# Altium PCB Vortex_PCB_final.PcbDoc (part 1 of 2)
Units mm, origin at the board's own origin, x right, y up, seen from the top; angles counter-clockwise.
Board outline 125 x 90 mm, 2 copper layers (Top Layer, Bottom Layer); 148 components, 88 nets, 464 pads, 104 vias.
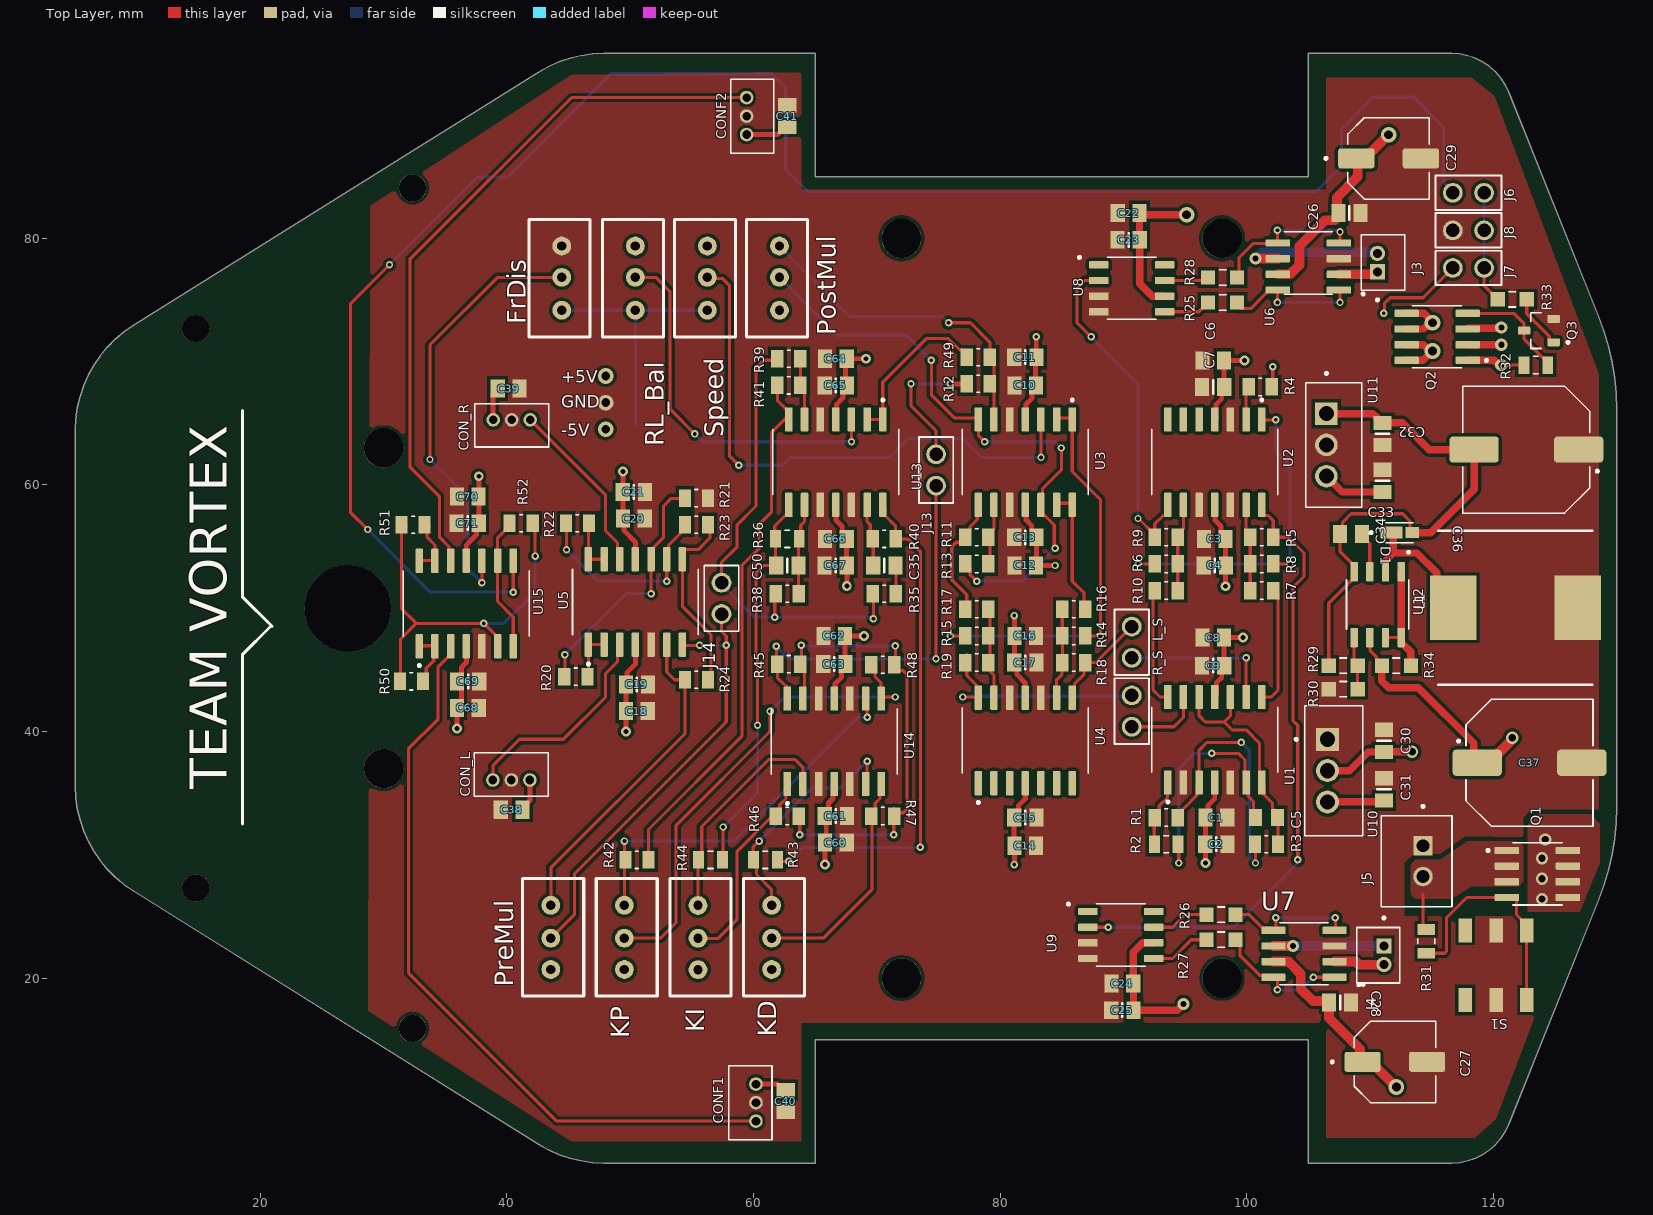
[diagram p0: Top Layer view]
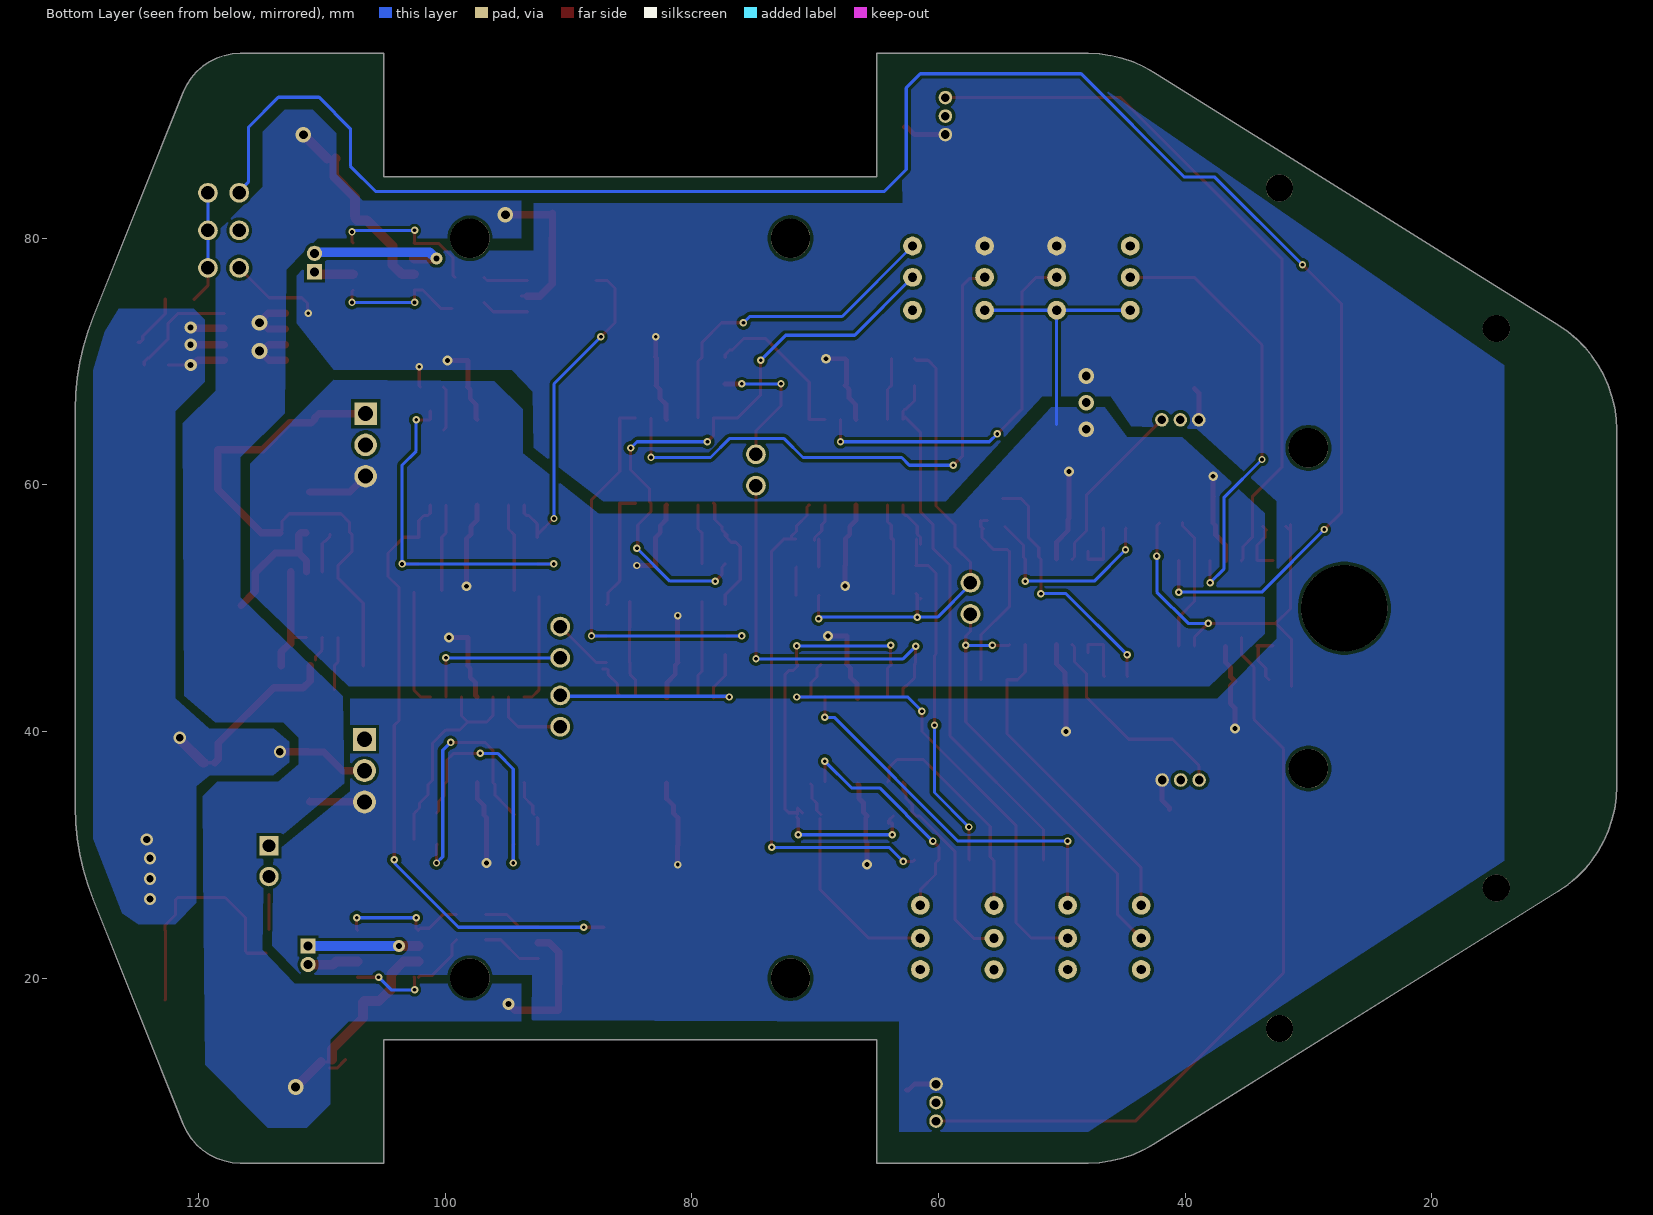
[diagram p1: Bottom Layer view, seen from below]
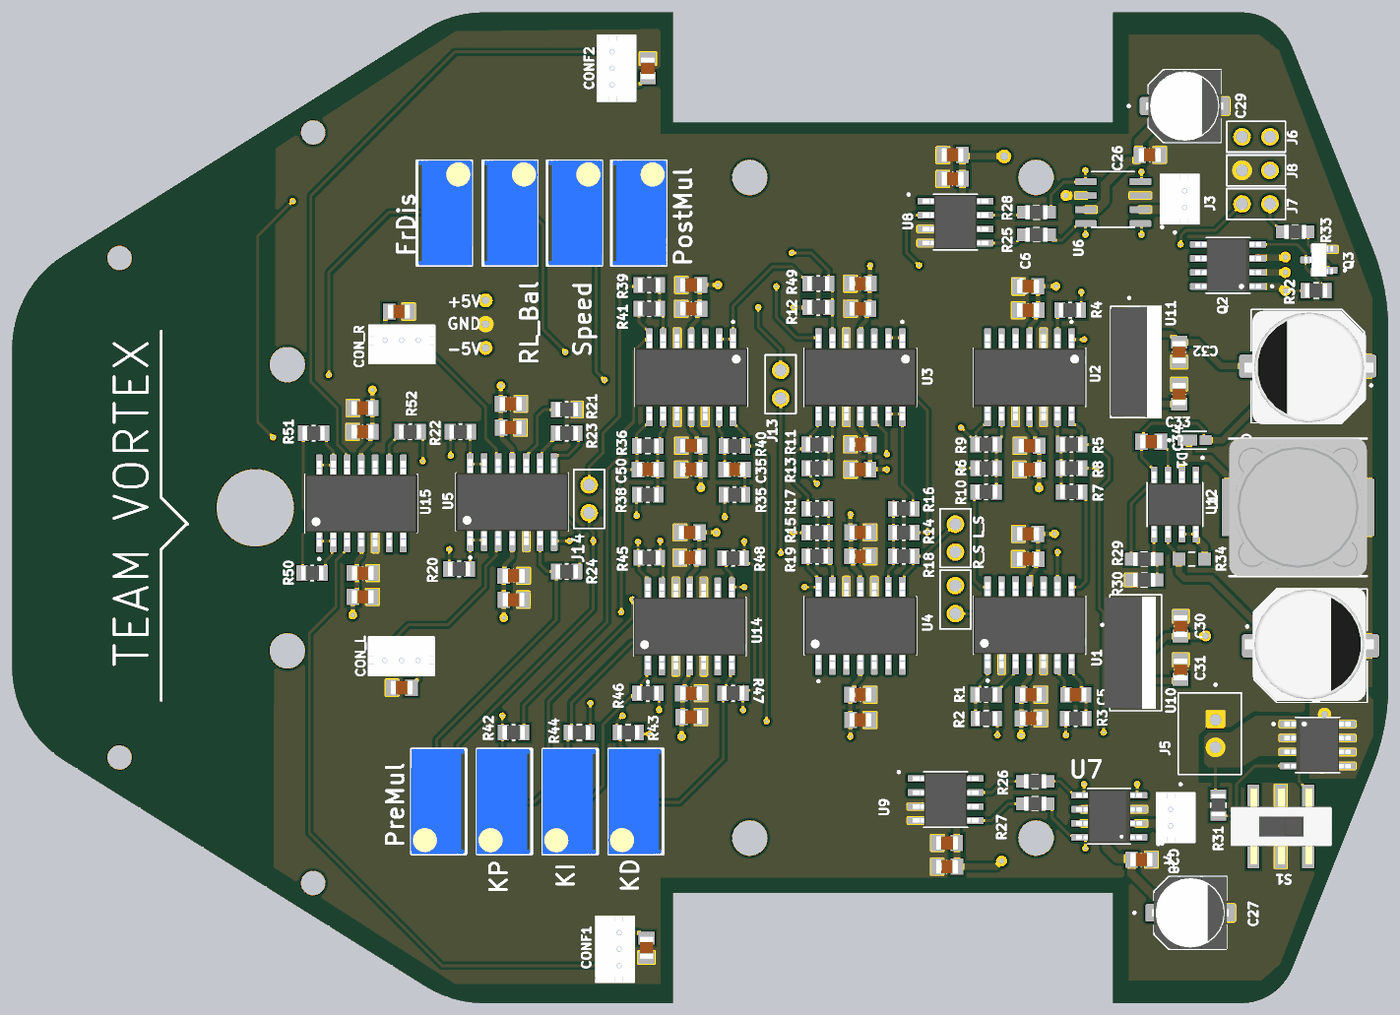
[diagram p2: 3D render of the assembled board from above, using the file's embedded part models]

## Layer stack, top to bottom
Top Solder: solder mask 0.0102, Solder Resist, Dk 3.5
Top Layer: signal copper 0.0356
Dielectric 1: dielectric 0.32, FR-4, Dk 4.8
Bottom Layer: signal copper 0.0356
Bottom Solder: solder mask 0.0102, Solder Resist, Dk 3.5

## Board outline
105,5 116.615,5 117.274,5.044 117.922,5.174 118.547,5.388 119.138,5.683 119.685,6.054 120.179,6.493 120.61,6.994 120.972,7.547 121.257,8.143 128.57,26.424 129.003,27.616 129.36,28.832 129.639,30.07 129.839,31.322 129.96,32.584 130,33.852 130,66.148 129.96,67.416 129.839,68.678 129.639,69.931 129.36,71.168 129.003,72.384 128.57,73.576 121.257,91.857 120.972,92.453 120.61,93.006 120.179,93.507 119.685,93.946 119.138,94.317 118.547,94.612 117.922,94.826 117.274,94.956 116.615,95 105,95 105,85 65,85 65,95 47.868,95 46.938,94.957 46.017,94.827 45.111,94.612 44.229,94.315 43.379,93.936 42.568,93.48 9.7,72.938 8.943,72.415 8.238,71.824 7.589,71.172 7.004,70.463 6.486,69.702 6.04,68.898 5.67,68.056 5.379,67.183 5.169,66.288 5.042,65.376 5,64.458 5,35.542 5.042,34.624 5.169,33.712 5.379,32.817 5.67,31.944 6.04,31.102 6.486,30.298 7.004,29.537 7.589,28.828 8.238,28.176 8.943,27.585 9.7,27.063 42.568,6.52 43.379,6.064 44.229,5.685 45.111,5.388 46.017,5.173 46.938,5.043 47.868,5 65,5 65,15 105,15

## Design rules (kind name [scope] priority, off if disabled: settings)
Clearance [All] p1: gap=0.254 ignorepadtopadclearanceinfootprint=FALSE except(0: Arc-Hole Track-Hole SMDPad-Hole THPad-Hole Via-Hole Fill-Hole Poly-Hole Region-Hole Text-Text Text-Hole; 0.2: SMDPad-SMDPad)
HoleSize [All] p1: absolutevalues=TRUE maxlimit=7 minlimit=0.025 maxpercent=80.000 minpercent=20.000
PolygonConnect [All] p1: connectstyle=Direct reliefconductorwidth=0.254 reliefentries=4 polygonreliefangle="90 Angle" airgapwidth=0.254
RoutingVias [All] p1: holewidth=0.711 width=1.27 viastyle="Through Hole" minholewidth=0.711 minwidth=1.27 maxholewidth=0.711 maxwidth=1.27
SilkToSilkClearance [All] p1: silktosilkclearance=0
SolderMaskExpansion [All] p1: expansion=0.102 istentingtop=FALSE
UnRoutedNet [All] p1: checkbadconnections=TRUE
Width [All] p1: maxlimit=1 minlimit=0.254 preferedwidth=0.254 minimp=50.000000 maximp=50.000000 favimp=50.000000
27 further rules are at their usual default settings.

## Classes and differential pairs
component class Sensor_Interface_SharpIR: C18 C19 C20 C21 C38 C39 CON_L CON_R PreMul R20 R21 R22 R23 R24 U5
component class PWM_Generator: C1 C2 C3 C4 C5 C6 C7 C8 C9 L_S R1 R2 R3 R4 R5 R6 R7 R8 R9 R10 R_S U1 U2
component class Power_Management: C C30 C31 C32 C33 C34 C36 C37 C? D1 D? J5 L1 L? Q1 Q2 Q3 R29 R30 R31 R32 R33 R34 S1 U10 U11 U12
component class PID_Controller: C35 C50 C60 C61 C62 C63 C64 C65 C66 C67 J14 KD KI KP R35 R36 R38 R39 R40 R41 R42 R43 R44 R45 R46 R47 R48 U13 U14
component class Mosfet_HBridge_Driver: C22 C23 C24 C25 C26 C27 C28 C29 J3 J4 R25 R26 R27 R28 U6 U7 U8 U9
component class "Front Obstacle Brake": C40 C41 C68 C69 C70 C71 CONF1 CONF2 FrDis J6 J7 J8 R50 R51 R52 U15
component class Differential_Drive_Mixer: C10 C11 C12 C13 C14 C15 C16 C17 J13 PostMul R11 R12 R13 R14 R15 R16 R17 R18 R19 R49 RL_Bal Speed U3 U4

## Components (designator, comment, footprint, x,y, rotation, side; value= is the part's Value field where it differs from the comment)
C1 "10uF" CAPC2012X145N 97.536,33.02 r180 top
C2 "0.1uF" CAPC2012X140N 97.536,30.861 r0 top
C3 "10uF" CAPC2012X145N 97.409,55.626 r0 top
C4 "0.1uF" CAPC2012X140N 97.409,53.467 r180 top
C5 "22nF" CAPC2012X135N 101.6,33.02 r180 top
C6 "10uF" CAPC2012X145N 97.282,70.104 r0 top
C7 "0.1uF" CAPC2012X140N 97.282,67.945 r180 top
C8 "10uF" CAPC2012X145N 97.282,47.625 r0 top
C9 "0.1uF" CAPC2012X140N 97.282,45.339 r180 top
C10 "10uF" CAPC2012X145N 82.042,68.072 r0 top
C11 "0.1uF" CAPC2012X140N 82.042,70.358 r180 top
C12 "10uF" CAPC2012X145N 82.042,53.467 r0 top
C13 "0.1uF" CAPC2012X140N 82.042,55.753 r180 top
C14 "10uF" CAPC2012X145N 82.042,30.734 r180 top
C15 "0.1uF" CAPC2012X140N 82.042,33.02 r0 top
C16 "10uF" CAPC2012X145N 82.042,47.752 r180 top
C17 "0.1uF" CAPC2012X140N 82.042,45.593 r0 top
C18 "10uF" CAPC2012X145N 50.546,41.656 r180 top
C19 "0.1uF" CAPC2012X140N 50.546,43.815 r0 top
C20 "10uF" CAPC2012X145N 50.292,57.277 r180 top
C21 "0.1uF" CAPC2012X140N 50.292,59.436 r0 top
C22 "10uF" CAPC2012X145N 90.424,82.042 r180 top
C23 "0.1uF" CAPC2012X140N 90.424,79.883 r0 top
C24 "10uF" CAPC2012X145N 89.916,19.558 r180 top
C25 "0.1uF" CAPC2012X140N 89.916,17.399 r0 top
C26 "0.1uF" CAPC2012X140N 108.331,82.042 r180 top
C27 "10uF" CAPAE660X610N 112.014,13.208 r0 top
C28 "0.1uF" CAPC2012X140N 107.569,18.034 r180 top
C29 "10uF" CAPAE660X610N 111.506,86.487 r0 top
C30 "0.1uF" CAPC2012X140N 111.125,39.243 r270 top
C31 "0.1uF" CAPC2012X140N 111.125,35.306 r270 top
C32 "0.1uF" CAPC2012X140N 110.998,64.135 r90 top
C33 "0.1uF" CAPC2012X140N 110.998,60.325 r270 top
C34 "1500pF" CAPC2012X145N 108.458,56.007 r180 top
C35 "1u" CAPC2012X140N 70.612,53.467 r180 top
C36 "220uF" CAPAE1030X1080N_UWT1H221MNL1GS 122.682,62.865 r180 top
C37 "100uF" CAPAE1030X1080N_UWT1H221MNL1GS 122.936,37.465 r0 top
C38 "10uF" CAPC2012X145N 40.386,33.655 r0 top
C39 "10uF" CAPC2012X145N 40.132,67.818 r180 top
C40 "10uF" CAPC2012X145N 62.611,10.033 r90 top
C41 "10uF" CAPC2012X145N 62.738,89.916 r270 top
C50 "47u" CAPC2012X140N 62.738,53.467 r0 top
C60 "10uF" CAPC2012X145N 66.675,30.988 r180 top
C61 "0.1uF" CAPC2012X140N 66.675,33.147 r0 top
C62 "10uF" CAPC2012X145N 66.548,47.752 r0 top
C63 "0.1uF" CAPC2012X140N 66.548,45.466 r180 top
C64 "10uF" CAPC2012X145N 66.675,70.231 r0 top
C65 "0.1uF" CAPC2012X140N 66.675,68.072 r180 top
C66 "10uF" CAPC2012X145N 66.675,55.626 r0 top
C67 "0.1uF" CAPC2012X140N 66.664,53.467 r180 top
C68 "10uF" CAPC2012X145N 36.839,41.91 r180 top
C69 "0.1uF" CAPC2012X140N 36.85,44.069 r0 top
C70 "10uF" CAPC2012X145N 36.821,59.055 r0 top
C71 "0.1uF" CAPC2012X140N 36.821,56.896 r180 top
CON_L "B3B-ZR" B3B-ZR 40.362,36.068 r180 top
CON_R "B3B-ZR" B3B-ZR 40.386,65.278 r0 top
CONF1 "B3B-ZR" B3B-ZR 60.198,9.906 r270 top
CONF2 "B3B-ZR" B3B-ZR 59.436,89.916 r90 top
D1 "SS24M" SODFL2512X73N 112.395,56.134 r0 top
FrDis "Variable Resistor" PCBComponent_1#1 44.45,75.679 r0 top
J3 "B2B-ZR" JST_B2B-ZR(LF)(SN) 111.052,78.032 r270 top
J4 "B2B-ZR" JST_B2B-ZR(LF)(SN) 110.675,21.856 r90 top
J5 "B2B-XH-A" JST_B2B-XH-A 113.775,29.484 r90 top
J6 "2_pin_header" CONN02_901200922_MOL 116.713,83.693 r0 top
J7 "2_pin_header" CONN02_901200922_MOL 116.713,77.597 r0 top
J8 "2_pin_header" CONN02_901200922_MOL 116.713,80.645 r0 top
J13 "male header" CONN02_901200922_MOL 74.803,62.484 r270 top
J14 "male header" CONN02_901200922_MOL 57.404,52.07 r270 top
KD "Variable Resistor" PCBComponent_1#1 61.468,24.397 r180 top
KI "Variable Resistor" PCBComponent_1#1 55.499,24.384 r180 top
KP "Variable Resistor" PCBComponent_1#1 49.53,24.397 r180 top
L1 "100uH" INDPM125125X800N 121.793,50.038 r0 top
L_S "male_header" CONN02_901200922_MOL 90.678,45.974 r90 top
PostMul "Variable Resistor" PCBComponent_1#1 62.103,75.679 r0 top
PreMul "Variable Resistor" PCBComponent_1#1 43.561,24.397 r180 top
Q1 "AO4407A" SOIC127P600X175-8N#1 123.571,28.448 r0 top
Q2 "AO4407A" SOIC127P600X175-8N#1 115.443,72.009 r180 top
Q3 "MMBT3904" TRANS_MMBT3904 123.698,72.517 r180 top
R1 "47k" RESC2012X65N 93.472,33.02 r0 top
R2 "1k" RESC2012X55N 93.472,30.861 r0 top
R3 "22k" RESC2012X65N 101.6,30.861 r180 top
R4 "22k" RESC2012X65N 101.092,67.945 r0 top
R5 "8.2k" RESC2012X65N 101.219,55.753 r0 top
R6 "8.2k" RESC2012X65N 93.472,55.753 r180 top
R7 "22k" RESC2012X65N 101.219,51.435 r180 top
R8 "22k" RESC2012X65N 101.219,53.594 r180 top
R9 "22k" RESC2012X65N 93.472,53.594 r0 top
R10 "22k" RESC2012X65N 93.472,51.435 r0 top
R11 "22k" RESC2012X65N 78.105,55.753 r0 top
R12 "22k" RESC2012X65N 78.232,68.199 r0 top
R13 "22k" RESC2012X65N 78.105,53.594 r0 top
R14 "47k" RESC2012X65N 85.979,47.752 r0 top
R15 "47k" RESC2012X65N 78.105,47.752 r180 top
R16 "22k" RESC2012X65N 85.979,49.911 r180 top
R17 "22k" RESC2012X65N 78.105,49.911 r0 top
R18 "22k" RESC2012X65N 85.979,45.593 r0 top
R19 "22k" RESC2012X65N 78.105,45.593 r180 top
R20 "22K" RESC2012X65N 45.593,44.45 r180 top
R21 "22k" RESC2012X65N 55.372,58.928 r0 top
R22 "22K" RESC2012X65N 45.72,56.896 r180 top
R23 "22k" RESC2012X65N 55.372,56.769 r0 top
R24 "22K" RESC2012X65N 55.372,44.196 r180 top
R25 "22" RES_ERJU06F22R0V 98.044,74.803 r0 top
R26 "22" RES_ERJU06F22R0V 97.917,25.146 r0 top
R27 "22" RES_ERJU06F22R0V 97.917,23.114 r0 top
R28 "22" RES_ERJU06F22R0V 98.044,76.835 r0 top
R29 "1K" RES_ERJU06F1001V 107.823,45.339 r180 top
R30 "4.7K" RES_ERJU06F1001V 107.823,43.434 r0 top
R31 "10K" RESC2012X55N 114.554,22.987 r270 top
R32 "10k" RESC2012X55N 123.444,69.723 r180 top
R33 "1k" RES_ERJU06F1001V 121.539,75.057 r0 top
R34 "0.75" RES_ERJ6BQJR75V 112.141,45.339 r180 top
R35 "22K" RESC2012X65N 70.612,51.181 r180 top
R36 "1M" RESC2012X55N 62.738,55.626 r180 top
R38 "47K" RESC2012X65N 62.738,51.181 r0 top
R39 "22K" RESC2012X65N 62.865,70.231 r0 top
R40 "22K" RESC2012X65N 70.612,55.626 r180 top
R41 "22K" RESC2012X65N 62.865,68.072 r0 top
R42 "22K" RESC2012X65N 50.546,29.591 r0 top
R43 "100K" RESC2012X55N 60.96,29.591 r0 top
R44 "56k" RESC2012X55N 56.515,29.591 r0 top
R45 "22K" RESC2012X65N 62.865,45.466 r180 top
R46 "22K" RESC2012X65N 62.738,33.147 r0 top
R47 "22K" RESC2012X65N 70.485,33.147 r0 top
R48 "22K" RESC2012X65N 70.485,45.42 r0 top
R49 "22k" RESC2012X65N 78.232,70.358 r0 top
R50 "47k" RESC2012X65N 32.258,44.069 r180 top
R51 "47k" RESC2012X65N 32.385,56.769 r180 top
R52 "22k" RESC2012X65N 41.148,56.896 r180 top
R_S "male_header" CONN02_901200922_MOL 90.678,40.386 r90 top
RL_Bal "Variable Resistor" PCBComponent_1#1 50.419,75.679 r0 top
S1 "SMT Slide Switch" PCBComponent_1#2 123.279,24.851 r180 top
Speed "Variable Resistor" PCBComponent_1#1 56.261,75.679 r0 top
U1 "TL084CNE4" SOIC127P780X200-14N 97.409,39.334 r90 top
U2 "TL084CNE4" SOIC127P780X200-14N 97.409,61.849 r270 top
U3 "TL084CNE4" SOIC127P780X200-14N 82.042,61.849 r270 top
U4 "TL084CNE4" SOIC127P780X200-14N 82.042,39.279 r90 top
U5 "TL084CNE4" SOIC127P780X200-14N 50.419,50.51 r90 top
U6 "ZXMHC3F381N8" SOIC127P600X175-8N#2 105,77.717 r180 top
U7 "ZXMHC3F381N8" SOIC127P600X175-8N#2 104.648,21.971 r180 top
U8 "TC4427EOA" SOIC127P599X175-8N 90.678,75.946 r0 top
U9 "TC4427EOA" SOIC127P599X175-8N 89.789,23.495 r0 top
U10 "LM7905CT" TO254P1054X470X1955-3 106.553,36.83 r270 top
U11 "LM7805T" TO254P1011X457X1950-3 107.061,63.246 r270 top
U12 "MC34063" SOIC127P599X175-8N 110.617,50.292 r270 top
U13 "TL084CNE4" SOIC127P780X200-14N 66.675,61.849 r270 top
U14 "TL084CNE4" SOIC127P780X200-14N 66.548,39.207 r90 top
U15 "TL084CNE4" SOIC127P780X200-14N 36.703,50.383 r90 top

## Footprints (in the part's own frame and the unit in brackets; to place one, negate y for a bottom-side part, rotate by r counter-clockwise, add the part's x,y. Pads: shape width x height; smd on the part's side, far side on the other; paste and mask are expansions set on the pad)
B3B-ZR [mm]
  round 1.1 hole 0.7: 1(-1.5,0) 2(0,0) 3(1.5,0)
  silkscreen extent -3,-2.2 3,1.3, body extent -3,-2.26 3,1.24, height 4.5
CAPAE660X610N [mm]
  rrect25% 2.94x1.62 smd: N(2.615,0) P(-2.615,0)
  silkscreen extent -5.18,-3.3 3.3,3.3, body extent -3.5,-3.3 3.5,3.3, height 6.4
CAPAE1030X1080N_UWT1H221MNL1GS [mm]
  rrect25% 3.99x2.12 smd: 1(-4.24,0) 2(4.24,0)
  silkscreen extent -5.85,-5.15 5.15,5.15, body extent -5.97,-5.02 5.73,5.28, height 10.93
CAPC2012X135N [mm]
  rect 1.05x1.38 smd: 1(-0.888,0) 2(0.888,0)
  body extent -1,-0.63 1,0.63, height 1.35
CAPC2012X140N [mm]
  rect 1.15x1.45 smd: 1(-0.9,0) 2(0.9,0)
  silkscreen extent 0,-0.55 0,0.55, body extent -1,-0.63 1,0.63, height 1.4
CAPC2012X145N [mm]
  rect 1.15x1.47 smd: 1(-0.88,0) 2(0.88,0)
  body extent -1,-0.63 1,0.63, height 1.45
CONN02_901200922_MOL [mil]
  round 63 hole 43: 1(0,0) 2(100,0)
  silkscreen extent -55,-55 155,55
INDPM125125X800N [mm]
  rect 3.75x5.2 smd: 1(-5.05,0) 2(5.05,0)
  silkscreen extent -6.25,-6.25 6.25,6.25, body extent -6.25,-6.25 6.25,6.25, height 7.5
JST_B2B-XH-A [mm]
  rect 1.575x1.575 / inner round 1.575 / far side rect 1.575x1.575 hole 1.05: 1(1.25,-0.525)
  round 1.575 hole 1.05: 2(-1.25,-0.525)
  silkscreen extent -3.7,-2.87 4.54,2.88
JST_B2B-ZR(LF)(SN) [mm]
  rect 1.238x1.238 / inner round 1.238 / far side rect 1.238x1.238 hole 0.73: 1(0.75,-0.45)
  round 1.238 hole 0.73: 2(-0.75,-0.45)
  silkscreen extent -2.25,-1.75 3.12,1.75, body extent -2.25,-1.75 2.25,1.75, height 4.5
PCBComponent_1#1 [mil]
  round 60 hole 30: 1(0,145.5) 2(0,45.5) 3(0,-59.5)
  silkscreen extent -105,-145 90,230, body extent -98,-145 92,231, height 440
PCBComponent_1#2 [mil]
  rect 43.31x76.77 smd: 0(21.65,260.83) 0(21.65,38.39) 1(120.08,260.83) 1(120.08,38.39) 2(218.5,260.83) 2(218.5,38.39)
  body extent -64,14 300,286, height 197
RES_ERJ6BQJR75V [mm]
  rect 1.15x1.15 smd: 1(-1.175,0) 2(1.175,0)
  silkscreen extent -0.28,-0.62 0.28,0.62
RES_ERJU06F22R0V [mm]
  rect 1.15x1.15 smd: 1(-1.175,0) 2(1.175,0)
  silkscreen extent -0.28,-0.62 0.28,0.62, body extent -1,-0.63 1,0.63, height 0.6
RES_ERJU06F1001V [mm]
  rect 1.15x1.15 smd: 1(-1.175,0) 2(1.175,0)
  silkscreen extent -0.28,-0.62 0.28,0.62, body extent -1,-0.63 1,0.63, height 0.6
RESC2012X55N [mm]
  rect 0.89x1.42 smd: 1(-0.97,0) 2(0.97,0)
  silkscreen extent -0.21,-0.7 0.21,0.7, body extent -1,-0.63 1,0.63, height 0.55
RESC2012X65N [mm]
  rect 1x1.42 smd: 1(-0.935,0) 2(0.935,0)
  silkscreen extent -0.12,-0.7 0.12,0.7, body extent -1,-0.63 1,0.63, height 0.65
SODFL2512X73N [mm]
  rect 1.09x0.88 smd: A(1.015,0)
  rect 1.79x0.98 smd: C(-0.665,0)
  silkscreen extent -2.4,-0.81 1.1,0.81
SOIC127P599X175-8N [mm]
  rrect25% 1.58x0.6 smd: 1(-2.67,1.905) 2(-2.67,0.635) 3(-2.67,-0.635) 4(-2.67,-1.905) 5(2.67,-1.905) 6(2.67,-0.635) 7(2.67,0.635) 8(2.67,1.905)
  silkscreen extent -4.35,-2.53 2,2.6, body extent -3,-2.45 3,2.45, height 1.75
SOIC127P600X175-8N#1 [mm]
  rrect25% 1.97x0.6 smd: 1(-2.475,1.905) 2(-2.475,0.635) 3(-2.475,-0.635) 4(-2.475,-1.905) 5(2.475,-1.905) 6(2.475,-0.635) 7(2.475,0.635) 8(2.475,1.905)
  silkscreen extent -4.1,-2.52 2,2.52, body extent -3,-2.45 3,2.45, height 1.75
SOIC127P600X175-8N#2 [mm]
  rrect25% 1.97x0.6 smd paste+0 mask+0.102: 1(-2.475,1.905) 2(-2.475,0.635) 3(-2.475,-0.635) 4(-2.475,-1.905) 5(2.475,-1.905) 6(2.475,-0.635) 7(2.475,0.635) 8(2.475,1.905)
SOIC127P780X200-14N [mm]
  rrect25% 1.97x0.61 smd paste+0 mask+0.102: 1(-3.465,3.81) 2(-3.465,2.54) 3(-3.465,1.27) 4(-3.465,0) 5(-3.465,-1.27) 6(-3.465,-2.54) 7(-3.465,-3.81) 8(3.465,-3.81) 9(3.465,-2.54) 10(3.465,-1.27) 11(3.465,0) 12(3.465,1.27) 13(3.465,2.54) 14(3.465,3.81)
  silkscreen extent -5.13,-5.1 2.65,5.1, body extent -3.9,-5.1 3.9,5.1, height 2
TO254P1011X457X1950-3 [mm]
  rect 1.83x1.83 / inner round 1.83 / far side rect 1.83x1.83 hole 1.22 mask+0.102: 1(-2.54,-0.6)
  round 1.83 hole 1.22 mask+0.102: 2(0,-0.6) 3(2.54,-0.6)
  silkscreen extent -5.9,-2.28 5.06,2.28, body extent -5.08,-2.28 5.08,2.28, height 19.5
TO254P1054X470X1955-3 [mm]
  rect 1.86x1.86 / inner round 1.86 / far side rect 1.86x1.86 hole 1.24: 1(-2.54,0)
  round 1.86 hole 1.24: 2(0,0) 3(2.54,0)
  silkscreen extent -5.27,-2.64 5.27,2.86, body extent -5.08,-2.35 5.08,2.35, height 15.49
TRANS_MMBT3904 [mm]
  rrect25% 1x0.65 smd paste+0 mask+0.102: 1(-1.2,0.95) 2(-1.2,-0.95) 3(1.2,0)
  silkscreen extent -2.46,-1.45 0.65,1.45, body extent -1.3,-1.52 1.3,1.52, height 1.3

## Part data
C1 C3 C6 C8 C10 C12 C14 C16 C18 C20 C22 C24 C38 C39 C40 C41 C60 C62 C64 C66 C68 C70: library part C2012X6S1C106K125AC, "C Series 0805 10 uF 16 V Â±10 % Tolerance X6S SMT Multilayer Ceramic Capacitor", Package="2012 TDK", Check_prices=https://www.snapeda.com/parts/C2012X6S1C106K125AC/TDK-Lambda+Americas+Inc/view-part/?ref=eda, MF=TDK, MP=C2012X6S1C106K125AC, Purchase-URL=https://pricing.snapeda.com/search/part/C2012X6S1C106K125AC/?ref=eda, SnapEDA_Link=https://www.snapeda.com/parts/C2012X6S1C106K125AC/TDK-Lambda+Americas+Inc/view-part/?ref=snap
C2 C4 C7 C9 C11 C13 C15 C17 C19 C21 C23 C25 C26 C28 C30 C31 C32 C33 C35 C50 C61 C63 C65 C67 C69 C71: library part FS055C104K4Z2A, "0.1 ÂµF Â±10% 50V Ceramic Capacitor X7R 0805 (2012 Metric)", Package="0805-2 AVX", Check_prices=https://www.snapeda.com/parts/FS055C104K4Z2A/AVX/view-part/?ref=eda, MF=AVX, MP=FS055C104K4Z2A, SnapEDA_Link=https://www.snapeda.com/parts/FS055C104K4Z2A/AVX/view-part/?ref=snap
C5: library part GRM21B5C1H223JA01L, "0805 22 nF 50 V Â±5% Tolerance C0G SMT Multilayer Ceramic Capacitor", Package="805-2 Murata", Check_prices=https://www.snapeda.com/parts/GRM21B5C1H223JA01L/Murata/view-part/?ref=eda, MF=Murata, MP=GRM21B5C1H223JA01L, SnapEDA_Link=https://www.snapeda.com/parts/GRM21B5C1H223JA01L/Murata/view-part/?ref=snap
C27 C29: library part UUD1H100MCL1GS, "Aluminum Electrolytic Capacitors - SMD, Low Impediance, 50volts 10uF", Package="RADIAL-2 Nichicon", Check_prices=https://www.snapeda.com/parts/UUD1H100MCL1GS/Nichicon/view-part/?ref=eda, MF=Nichicon, MP=UUD1H100MCL1GS, SnapEDA_Link=https://www.snapeda.com/parts/UUD1H100MCL1GS/Nichicon/view-part/?ref=snap
C34: library part VJ0805A152JXAAC, "1500 pF Â±5% 50V Ceramic Capacitor C0G, NP0 0805 (2012 Metric)", Package="2012 Vishay Vitramon", Check_prices=https://www.snapeda.com/parts/VJ0805A152JXAAC/Vishay/view-part/?ref=eda, MF="Vishay Vitramon", MP=VJ0805A152JXAAC, SnapEDA_Link=https://www.snapeda.com/parts/VJ0805A152JXAAC/Vishay/view-part/?ref=snap
C36 C37: library part UWT1H221MNL1GS, "220ÂµF 50V Aluminum Electrolytic Capacitors Radial, Can - SMD 1000 Hrs @ 105Â°C", Package="Radial Nichicon", Availability=Unavailable, MF=Nichicon, MP=UWT1H221MNL1GS, Price=None, SnapEDA_Link=https://www.snapeda.com/parts/UWT1H221MNL1GS/Nichicon/view-part/566503/?ref=snap
CON_L CON_R CONF1 CONF2: "Connector Header Surface Mount 3 position 0.059 (1.50mm)", Package=None, Check_prices=https://www.snapeda.com/parts/B3B-ZR/JST+Sales+America+Inc./view-part/?ref=eda, MF="JST Sales", MP=B3B-ZR, SnapEDA_Link=https://www.snapeda.com/parts/B3B-ZR/JST+Sales+America+Inc./view-part/?ref=snap
D1 J5: Package=None, Availability=Unavailable, Price=None
  D1: MP=SS24M
  J5: MF="{'manufacturer': u'JST Sales America Inc.'}", MP=B2B-XH-A
J3 J4: library part B2B-ZR(LF)(SN), "Connector Header Through Hole 2 position 0.059 (1.50mm)", Package=None, Check_prices=https://www.snapeda.com/parts/B2B-ZR(LF)(SN)/JST+Sales+America+Inc./view-part/?ref=eda, MF="JST Sales", MP=B2B-ZR(LF)(SN), SnapEDA_Link=https://www.snapeda.com/parts/B2B-ZR(LF)(SN)/JST+Sales+America+Inc./view-part/?ref=snap
J6 J7 J8 J13 J14 L_S R_S: library part 901200922, Package=None, Availability=Unavailable, MP=901200922, Price=None
L1: library part SRR1280-101M, "100ÂµH Shielded Wirewound Inductor 2.1A 150mOhm Max Nonstandard", Package="Nonstandard Bourns", Availability=Good, Check_prices=https://www.snapeda.com/parts/SRR1280-101M/Bourns%20-%20J.W.%20Miller/view-part/289867/?ref=eda, MF=Bourns, MP=SRR1280-101M, Price=None, Purchase-URL=https://pricing.snapeda.com/search/part/SRR1280-101M/?ref=eda, SnapEDA_Link=https://www.snapeda.com/parts/SRR1280-101M/Bourns%20-%20J.W.%20Miller/view-part/289867/?ref=snap
Q1 Q2: "P-Channel 30 V 12A (Ta) 3.1W (Ta) Surface Mount 8-SOIC", Package="SOIC-8 Alpha &amp; Omega Semiconductor", Check_prices=https://www.snapeda.com/parts/AO4407A/Alpha/view-part/?ref=eda, MF="Alpha &", MP=AO4407A, SnapEDA_Link=https://www.snapeda.com/parts/AO4407A/Alpha/view-part/?ref=snap
Q3: "BJT, SOT-23, 40V, 200mA, NPN, 0.35W, 150Â°C", Package="SOT-23 Diotec", Check_prices=https://www.snapeda.com/parts/MMBT3904/Diotec/view-part/?ref=eda, MF="Diotec Semiconductor", MP=MMBT3904, SnapEDA_Link=https://www.snapeda.com/parts/MMBT3904/Diotec/view-part/?ref=snap
R1 R14 R15 R38 R50 R51: library part CRGCQ0805F47K, "Fixed Resistor CRGCQ 0805 47K 1%", Package="2012 TE Connectivity", Check_prices=https://www.snapeda.com/parts/CRGCQ0805F47K/TE+Connectivity/view-part/?ref=eda, MF="TE Connectivity", MP=CRGCQ0805F47K, SnapEDA_Link=https://www.snapeda.com/parts/CRGCQ0805F47K/TE+Connectivity/view-part/?ref=snap
R2 R31 R32 R36 R43 R44: library part MCU08050C1002FPW00, "Res Thin Film 0805 10K Ohm 1% 0.125W(1/8W) Â±50ppm/Â°C Sulfur Resistant Pad SMD Automotive Medical T/R", Package="2012 Vishay", Check_prices=https://www.snapeda.com/parts/MCU08050C1002FPW00/Vishay/view-part/?ref=eda, MF=Vishay, MP=MCU08050C1002FPW00, SnapEDA_Link=https://www.snapeda.com/parts/MCU08050C1002FPW00/Vishay/view-part/?ref=snap
R3 R4 R5 R6 R7 R8 R9 R10 R11 R12 R13 R16 R17 R18 R19 R20 R21 R22 R23 R24 R35 R39 R40 R41 R42 R45 R46 R47 R48 R49 R52: library part CRGCQ0805F22K, "Fixed Resistor CRGCQ 0805 22K 1%", Package="2012 TE Connectivity", Check_prices=https://www.snapeda.com/parts/CRGCQ0805F22K/TE+Connectivity/view-part/?ref=eda, MF="TE Connectivity", MP=CRGCQ0805F22K, SnapEDA_Link=https://www.snapeda.com/parts/CRGCQ0805F22K/TE+Connectivity/view-part/?ref=snap
R25 R26 R27 R28: library part ERJU06F22R0V, Package=None, Availability=Unavailable, MP=ERJU06F22R0V, Price=None
R29 R30 R33: library part ERJU06F1001V, "Res Thick Film 0805 1K Ohm 1% 0.125W(1/8W) Â±100ppm/C Sulfur Resistant Pad SMD Automotive T/R", Package="2012-2 Panasonic", Availability="No availability data", Check_prices=https://www.snapeda.com/parts/ERJU06F1001V/Panasonic/view-part/5742057/?ref=eda, MF=Panasonic, MP=ERJU06F1001V, Price=None, SnapEDA_Link=https://www.snapeda.com/parts/ERJU06F1001V/Panasonic/view-part/5742057/?ref=snap
R34: library part ERJ6BQJR75V, Package=None, Availability=Unavailable, MP=ERJ6BQJR75V, Price=None
U1 U2 U3 U4 U5 U13 U14 U15: "Quad High Slew Rate JFET-Input Operational Amplifier 14-PDIP 0 to 70", Package="PDIP-14 Texas Instruments", Check_prices=https://www.snapeda.com/parts/TL084CNE4/Texas+Instruments/view-part/?ref=eda, MF="Texas Instruments", MP=TL084CNE4, SnapEDA_Link=https://www.snapeda.com/parts/TL084CNE4/Texas+Instruments/view-part/?ref=snap
U6 U7: "N-Channel+P-Channel Array 30V 4.1A 0.95W Surface Mount SO-8"
U8 U9: "Low-Side Gate Driver IC Non-Inverting 8-SOIC", Package="SOIC-8 Microchip", Availability="In Stock", Check_prices=https://www.snapeda.com/parts/TC4427EOA/Microchip/view-part/?ref=eda, MF=Microchip, MP=TC4427EOA, Price=None, Purchase-URL=https://pricing.snapeda.com/search/part/TC4427EOA/?ref=eda, SnapEDA_Link=https://www.snapeda.com/parts/TC4427EOA/Microchip/view-part/?ref=snap
U10: "1.5-A, negative linear voltage regulator 3-TO-220 0 to 125", Package="TO-220-3 Texas Instruments", Check_prices=https://www.snapeda.com/parts/LM7905CT/Texas+Instruments/view-part/?ref=eda, MF="Texas Instruments", MP=LM7905CT, SnapEDA_Link=https://www.snapeda.com/parts/LM7905CT/Texas+Instruments/view-part/?ref=snap
U11: "3-Terminal 1.5A Positive Fixed Voltage Regulator", Package="TO-220-3 TAEJIN", Check_prices=https://www.snapeda.com/parts/LM7805T/TAEJIN/view-part/?ref=eda, MF=TAEJIN, MP=LM7805T, SnapEDA_Link=https://www.snapeda.com/parts/LM7805T/TAEJIN/view-part/?ref=snap
U12: library part MC34063ADR2G, "Buck, Boost Switching Regulator IC Positive or Negative Adjustable 1.25V 1 Output 1.5A (Switch) 8-SOIC (0.154, 3.90mm Width)", Package="SOIC-8 ON Semiconductor", Check_prices=https://www.snapeda.com/parts/MC34063ADR2G/Onsemi/view-part/?ref=eda, MF="ON Semiconductor", MP=MC34063ADR2G, SnapEDA_Link=https://www.snapeda.com/parts/MC34063ADR2G/Onsemi/view-part/?ref=snap

## Free pads (board coordinates)
  round 2.2 hole 2.2: 1(14.76,27.32) 1(14.76,72.68) 1(32.343,15.911) 1(32.343,84.089)
  round 7 hole 7: 1(27.085,50)
  round 3.2 hole 3.2: 1(30,37) 1(30,63) 1(72,20) 1(72,80) 1(98,20) 1(98,80)

## Via types
v1: diameter 0.6, hole 0.3, Top Layer to Bottom Layer, 72 vias
v2: diameter 0.8, hole 0.4, Top Layer to Bottom Layer, 12 vias
v3: diameter 1.27, hole 0.711, Top Layer to Bottom Layer, 8 vias
v4: diameter 1, hole 0.5, Top Layer to Bottom Layer, 6 vias
v5: diameter 1, hole 0.6, Top Layer to Bottom Layer, 6 vias

## Nets (pads, with @x,y where several pads share a name; then routed paths per layer and width w, separated by ;. In a path a pad name is that pad's centre, name@x,y a point inside that pad or via, vN(x,y) a via of type N, cw(c..) or ccw(c..) an arc to the next point about the centre after c; other vN are vias at no path point)
+5V: C1.2 C2.1 C6.2 C7.1 C10.2 C11.1 C14.2 C15.1 C18.2 C19.1 C31.2 C38.2 C39.2 C40.2 C41.2 C60.2 C61.1 C64.2 C65.1 C68.2 C69.1 CON_L.1 CON_R.1 CONF1.1 CONF2.1 J7.1 R4.2 RL_Bal.1 Speed.1 U1.4 U2.4 U3.4 U4.4 U5.4 U10.3 U13.4 U14.4 U15.4 | length 81.4
  Top Layer w0.254: C68.2@35.941,41.892 C68.2 ; C18.2@49.657,41.647 C18.2 ; C60.2 C60.2@65.81,30.973 ; C64.2 C64.2@67.56,70.236 ; C14.2@81.153,30.725 C14.2 ; C11.1@82.931,70.369 C11.1 ; R4.2 102.108,68.026 v1(102.108,69.596) ; C31.2@110.998,34.533 C31.2@111.009,34.544 ; C31.2@111.009,34.29 C31.2 ; v1(111.125,73.914) 111.162,73.951 111.162,74.713 111.633,75.184 114.3,75.184 J7.1
  Top Layer w0.4: v2(35.941,40.259) C68.2@35.941,41.892 ; C68.2 36.316,42.267 36.316,43.703 C69.1 36.307,44.426 36.307,45.197 36.719,45.609 36.719,46.902 U15.4 ; CON_R.1 38.886,67.452 C39.2 ; C38.2 41.266,33.815 41.862,34.411 CON_L.1 ; v2(49.657,40.005) C18.2@49.657,41.647 ; C18.2 49.646,41.676 C19.1 49.725,43.894 49.725,44.772 50.419,45.466 U5.4 ; CONF2.1 61.958,88.416 62.578,89.036 C41.2 ; CONF1.1 61.958,11.406 62.451,10.913 C40.2 ; C60.2 65.898,31.091 65.898,33.024 C61.1 66.084,33.456 66.084,34.207 66.443,34.566 66.443,35.637 U14.4 ; v2(65.81,29.215) C60.2@65.81,30.973 ; U13.4 66.737,65.376 66.737,66.546 67.245,67.054 67.245,67.742 C65.1 ; C65.1@67.544,68.072 67.444,68.171 67.444,70.12 C64.2 ; C64.2@67.56,70.236 v2(69.112,70.236) ; v1(81.153,29.21) C14.2@81.153,30.725 ; C14.2 81.142,30.754 C15.1 81.475,33.353 81.475,33.977 82.042,34.544 U4.4 ; U3.4 82.103,65.375 82.103,66.547 82.596,67.04 82.596,67.746 C10.2 82.877,68.117 82.877,70.293 C11.1 ; C11.1@82.931,70.369 v1(82.931,72.009) ; v2(96.647,29.337) 96.647,30.85 C2.1 96.656,30.881 C1.2 96.852,33.216 96.852,33.987 97.409,34.544 U1.4 ; U2.4 97.494,65.399 97.494,66.506 97.976,66.988 97.976,67.739 C7.1 98.162,67.965 C6.2 v2(99.822,70.104)
  Top Layer w0.6: U10.3@106.807,34.29 C31.2@111.009,34.29
  other v3: 48.006,68.834
-5V: C3.2 C4.1 C8.2 C9.1 C12.2 C13.1 C16.2 C17.1 C20.2 C21.1 C33.2 C62.2 C63.1 C66.2 C67.1 C70.2 C71.1 FrDis.3 RL_Bal.3 Speed.3 U1.11 U2.11 U3.11 U4.11 U5.11 U11.3 U13.11 U14.11 U15.11 | length 82.4
  Top Layer w0.254: C70.2 C70.2@37.719,59.073 ; C21.1 C21.1@49.403,59.447 ; C67.1@67.555,53.476 C67.1 ; C16.2@81.153,47.761 C16.2 ; C4.1@98.277,53.435 C4.1
  Top Layer w0.4: U15.11 36.703,55.118 37.524,55.939 37.524,56.699 C71.1 37.721,59.035 C70.2 ; C70.2@37.719,59.073 v2(37.719,60.706) ; C21.1 49.412,59.416 C20.2 49.481,57.208 49.481,56.31 50.419,55.372 U5.11 ; C21.1@49.403,59.447 v2(49.403,61.087) ; U14.11 66.623,42.747 66.623,43.89 67.149,44.416 67.149,45.167 C63.1 ; U13.11 66.705,58.354 66.705,57.12 67.198,56.627 67.198,55.983 C66.2 C67.1@67.555,53.476 ; C63.1@67.408,45.466 C62.2@67.408,47.732 ; C62.2 v2(68.961,47.752) ; v2(67.564,51.816) C67.1 ; C17.1 81.348,45.387 81.348,44.636 82.023,43.961 82.023,42.763 U4.11 ; C16.2@81.153,47.761 v1(81.153,49.403) ; C17.1@81.162,45.613 C16.2 ; U3.11 82.107,58.319 82.107,57.155 82.567,56.695 82.567,56.128 C13.1 82.942,53.487 C12.2 v1(84.455,53.467) ; U1.11 97.539,42.929 97.539,43.945 97.976,44.382 97.976,45.133 C9.1 98.162,45.359 C8.2 v2(99.695,47.625) ; U2.11 97.439,58.354 97.439,57.12 97.917,56.642 97.917,55.998 C3.2 98.289,53.487 C4.1 ; v2(98.277,51.785) C4.1@98.277,53.435
  Top Layer w0.6: U11.3 107.742,59.425 C33.2
  Bottom Layer w0.254: FrDis.3 RL_Bal.3 ; 50.419,64.897 RL_Bal.3 ; Speed.3 RL_Bal.3
  other v3: 48.006,64.516
Brake_Dis: FrDis.2 U15.10 | length 35.8
  Top Layer w0.254: v1(33.764,62.063) 33.764,71.356 39.243,76.835 FrDis.2 ; v1(37.973,52.07) U15.10
  Bottom Layer w0.254: v1(33.764,62.063) 36.83,58.998 36.83,53.213 v1(37.973,52.07)
Cin: R34.1 U12.1 U12.7 U12.8 | length 9.3
  Top Layer w0.254: U12.7 U12.8
  Top Layer w0.6: U12.1 U12.8 112.522,47.132 112.634,47.132 113.303,46.463 113.303,45.352 R34.1
"Control Signal": J13.2 R45.2 U14.14 | length 32.6
  Top Layer w0.254: v1(61.849,46.909) 61.849,45.547 R45.2 61.93,44.375 62.612,43.693 62.687,43.693 62.865,43.515 U14.14@62.865,42.835 ; v1(74.803,45.893) 74.803,59.707 75.184,60.088 J13.2@75.184,60.452
  Bottom Layer w0.254: v1(61.849,46.909) 62.865,45.893 v1(74.803,45.893)
"Control Signal In": J13.1 R12.1 | length 11.1
  Top Layer w0.254: v1(72.771,68.199) 72.771,66.421 74.803,64.389 J13.1
  Top Layer w0.4: v1(75.946,68.199) R12.1
  Bottom Layer w0.254: v1(72.771,68.199) v1(75.946,68.199)
"Diff L": L_S.2 R18.2 U4.8 | length 7.9
  Top Layer w0.254: U4.8@85.852,42.926 86.03,43.104 86.03,43.866 86.815,44.651 86.815,45.01 86.871,45.067 R18.2@87.231,45.067 ; R18.2 87.757,45.593 L_S.2
"Diff L IN": L_S.1 U1.9 | length 12.4
  Top Layer w0.254: U1.9 v1(99.949,45.974)
  Bottom Layer w0.254: L_S.1 v1(99.949,45.974)
"Diff R": R19.2 R_S.2 U4.14 | length 18.8
  Top Layer w0.254: v1(76.962,42.799) 78.177,42.799 U4.14 ; R19.2@77.297,46.228 77.297,44.541 78.232,43.606 U4.14@78.232,42.926
  Bottom Layer w0.254: v1(76.962,42.799) 77.025,42.862 90.614,42.862 R_S.2
"Diff R IN": R_S.1 U1.13 | length 6.2
  Top Layer w0.254: R_S.1 94.107,40.386 94.869,41.148 U1.13
"Diff U3O1": PostMul.2 R13.1 U3.7 U3.12 | length 49.5
  Top Layer w0.254: v1(74.422,70.104) 74.422,67.31 76.291,65.441 78.232,65.441 78.259,65.414 78.259,63.982 v1(78.74,63.5) ; R13.1@77.297,53.594 77.543,53.348 77.543,52.759 v1(78.105,52.197) ; v1(84.455,54.864) 84.389,54.93 84.389,56.754 83.312,57.831 83.312,58.511 83.424,58.623 83.424,59.675 84.963,61.214 v1(84.963,62.992)
  Bottom Layer w0.254: PostMul.2 66.802,72.136 72.39,72.136 v1(74.422,70.104) ; v1(78.105,52.197) 81.788,52.197 v1(84.455,54.864) ; v1(78.74,63.5) 84.455,63.5 v1(84.963,62.992)
"Diff U3O2": R16.1 U3.13 U3.14 | length 9.9
  Top Layer w0.254: U3.13@84.582,58.511 85.852,58.511 85.852,52.197 86.815,51.234 86.815,50.391 R16.1@86.914,50.292
"Diff U3O3": R11.1 R17.1 U3.8 | length 10.1
  Top Layer w0.254: R11.1 77.17,55.963 77.543,56.336 77.543,56.588 78.147,57.192 78.147,58.426 U3.8@78.232,58.511 ; R17.1@77.297,50.292 77.297,51.1 76.073,52.324 76.073,54.991 76.438,55.356 76.797,55.356 77.297,55.856 R11.1@77.297,55.963
"Diff U3O4": R14.2 R15.2 U3.1 U3.2 | length 34.5
  Top Layer w0.254: v1(75.946,47.752) R15.2 ; U3.2@84.582,65.441 85.852,65.441 85.852,61.087 88.138,58.801 v1(88.138,47.752) R14.2
  Bottom Layer w0.254: v1(75.946,47.752) v1(88.138,47.752)
DIFF_OUT: R23.2 R24.1 U5.8 | length 16
  Top Layer w0.254: R23.2@56.021,57.119 R23.2@56.38,57.119 ; R23.2@56.335,56.416 R23.2@56.561,56.642 ; R23.2@56.462,56.416 56.462,55.7 55.519,54.757 54.407,54.757 54.229,54.579 U5.8 54.229,50.165 56.561,47.833 R24.1@56.561,44.196 ; R23.2@56.568,56.586 R23.2@56.568,57.113
Distance_Error: J14.1 R35.2 R38.1 R39.1 | length 38.1
  Top Layer w0.254: J14.1@57.404,51.943 57.404,53.721 58.674,54.991 58.674,56.769 60.198,58.293 60.198,69.469 60.841,70.112 61.811,70.112 R39.1 ; R38.1@61.422,50.8 R38.1@61.468,50.754 ; v1(61.722,49.276) 61.722,51.1 R38.1 ; R35.2@69.677,51.054 69.723,51.008 v1(69.723,49.149)
  Bottom Layer w0.254: J14.1@57.404,51.943 60.071,49.276 v1(61.722,49.276) 69.502,49.276 69.629,49.149 v1(69.723,49.149)
GAIN_OUT: J14.2 PreMul.2 U5.7 | length 35.9
  Top Layer w0.254: PreMul.2 45.466,25.146 45.466,28.448 57.785,40.767 v1@57.785,47.084 ; U5.7 54.284,46.99 v1(55.626,46.99) ; J14.2@57.404,49.403 57.404,48.133 57.785,47.752 v1(57.785,46.99)
  Bottom Layer w0.254: v1(55.626,46.99) v1(57.785,46.99)
GND: C1.1 C2.2 C3.1 C4.2 C6.1 C7.2 C8.1 C9.2 C10.1 C11.2 C12.1 C13.2 C14.1 C15.2 C16.1 C17.2 C18.1 C19.2 C20.1 C21.2 C22.2 C23.1 C24.2 C25.1 C26.1 C27.N C28.1 C29.N C30.1 C31.1 C32.1 C33.1 C36.1 C37.2 C38.1 C39.1 C40.1 C41.1 C60.1 C61.2 C62.1 C63.2 C64.1 C65.2 C66.1 C67.2 C68.1 C69.2 C70.1 C71.2 CON_L.2 CON_R.2 CONF1.2 CONF2.2 FrDis.1 J5.1 J8.1 L1.2 Q3.2 R21.2 R30.1 S1.1 U1.2 U1.5 U2.3 U2.10 U2.12 U3.5 U3.10 U4.10 U4.12 U5.5 U6.3 U7.3 U8.3 U8.4 U9.3 U9.4 U10.1 U11.2 U13.5 U13.10 U13.12 U14.3 U14.5 U14.10 U14.12 U15.5
  other v3: 48.006,66.675
INV_IN: PreMul.3 R24.2 U5.6 | length 26.7
  Top Layer w0.254: PreMul.3 43.561,28.956 54.437,39.832 R24.2 53.594,44.196 52.959,44.831 U5.6
Linear_S: Speed.2 U3.3 | length 46.2
  Top Layer w0.254: Speed.2 56.366,76.73 57.509,76.73 58.039,76.2 58.039,62.357 v1(58.801,61.595) ; v1(83.312,62.23) U3.3 U3.3@83.312,65.441
  Bottom Layer w0.254: v1(58.801,61.595) 62.357,61.595 62.992,62.23 70.993,62.23 72.517,63.754 76.962,63.754 78.486,62.23 v1(83.312,62.23)
M1_T1: J3.2 U6.6 | length 12
  Top Layer w0.8: v4(100.711,78.359) 100.715,78.355 102.522,78.355 U6.6
  Bottom Layer w0.8: v4(100.711,78.359) 100.765,78.359 101.273,78.867 110.377,78.867 110.408,78.898 110.644,78.898 J3.2@110.675,78.867
M1_T2: J3.1 U6.2 | length 3.5
  Top Layer w0.254: J3.1@110.202,76.882 J3.1
  Top Layer w0.8: U6.2 J3.1@110.402,77.082
M2_T1: J4.2 U7.2 | length 3.9
  Top Layer w0.8: U7.2 108.839,21.336 109.093,21.082 J4.2@110.923,21.082
M2_T2: J4.1 U7.6 | length 8.9
  Top Layer w0.8: U7.6 v4(103.759,22.606)
  Bottom Layer w0.8: v4@103.813,22.606 J4.1
Motor_EN: J6.2 J7.2 J8.2 R33.1 | length 9.1
  Top Layer w0.254: J7.2 119.253,76.168 R33.1
  Bottom Layer w0.254: J7.2 J8.2 J6.2
NetC5_2: C5.2 R2.2 U1.6 | length 19.9
  Top Layer w0.254: R2.2 94.488,30.815 v1(94.488,29.337) ; v1(97.155,38.227) 99.314,38.227 99.855,37.686 99.855,35.963 100.115,35.703 100.115,34.759 100.551,34.323 100.551,33.562 C5.2@100.712,33.401
  Bottom Layer w0.254: v1(94.488,29.337) 94.488,36.957 95.758,38.227 v1(97.155,38.227)
NetC34_1: C34.1 U12.3 | length 3.3
  Top Layer w0.254: C34.1 109.338,55.847 109.786,55.399 109.833,55.399 109.982,55.25 U12.3
NetC35_1: C35.1 R35.1 | length 2.3
  Top Layer w0.254: C35.1@71.512,53.34 71.547,53.305 R35.1@71.547,51.054
NetC35_2: C35.2 R40.2 U13.13 | length 5.5
  Top Layer w0.254: U13.13 69.215,57.023 69.469,56.769 69.469,56.298 70.058,55.709 R40.2@70.058,55.499 ; R40.2 69.712,55.591 C35.2@69.712,53.34
NetC50_2: C50.2 R36.1 R38.2 U13.9 | length 7.4
  Top Layer w0.254: R38.2 63.638,51.216 C50.2 63.638,55.556 R36.1 ; R36.1@63.835,55.626 63.835,56.723 64.135,57.023 U13.9
NetD1_C: D1.C L1.1 U12.2 | length 11.2
  Top Layer w0.6: U12.2 111.252,53.848 111.887,54.483 ; D1.C@111.325,56.134 D1.C 111.887,55.977 111.887,54.483 ; L1.1@116.562,50.219 115.405,51.376 115.405,52.87 113.792,54.483 111.887,54.483
NetPostMul_1: PostMul.1 R12.2 R49.2 U3.6 | length 26.6
  Top Layer w0.254: v1(75.819,73.152) 77.597,73.152 79.167,71.582 R49.2 79.502,70.023 U3.6@79.502,65.441
  Bottom Layer w0.254: PostMul.1 67.818,73.66 75.311,73.66 v1(75.819,73.152)
NetQ1_4: Q1.4 R31.2 S1.0 | length 19.4
  Top Layer w0.254: R31.2 116.056,22.017 116.205,22.166 116.205,24.892 117.856,26.543 Q1.4 121.706,26.543 121.879,26.37 121.879,25.151 122.729,24.301 122.729,23.876 122.68,23.827 122.68,18.275 S1.0@122.729,18.226
NetQ2_4: Q2.4 Q3.3 R32.1 | length 9.1
  Top Layer w0.254: Q2.4 121.666,73.914 122.498,73.082 Q3.3 122.498,71.811 124.003,70.306 124.096,70.306 124.414,69.988 R32.1
NetQ3_1: Q3.1 R33.2 | length 4.5
  Top Layer w0.254: R33.2 122.714,73.882 124.534,72.063 124.534,71.765 124.732,71.567 Q3.1
NetR1_2: R1.2 R3.2 U1.3 | length 21.4
  Top Layer w0.254: R1.2@94.407,33.274 94.451,33.274 94.78,33.603 94.78,33.647 94.99,33.857 95.961,34.828 95.961,35.691 U1.3 96.139,38.481 96.774,39.116 v1(99.568,39.116) ; R3.2 100.711,30.815 v1(100.711,29.337)
  Bottom Layer w0.254: v1(99.568,39.116) 100.203,38.481 100.203,29.845 v1(100.711,29.337)
NetR4_1: R4.1 U2.2 | length 3.6
  Top Layer w0.254: U2.2@100.127,64.456 99.949,64.634 U2.2 99.949,67.737 R4.1
NetR5_1: R5.1 R7.2 R8.2 U2.13 | length 7.1
  Top Layer w0.254: U2.13 99.949,56.088 R5.1 R8.2 R7.2
NetR6_1: R6.1 R9.2 R10.2 U2.9 | length 7.1
  Top Layer w0.254: R10.2 R9.2 94.407,55.963 94.869,56.425 U2.9
NetR11_2: R11.2 R13.2 U3.9 | length 4.9
  Top Layer w0.254: R13.2@79.167,53.594 79.167,56.09 79.502,56.425 U3.9
NetR14_1: R14.1 R16.2 R18.1 U4.9 | length 7.8
  Top Layer w0.254: U4.9@84.582,42.926 84.582,44.207 85.026,44.651 85.026,45.575 R18.1 85.044,46.228 85.044,48.387 R16.2@85.044,50.546
NetR15_1: R15.1 R17.2 R19.1 U4.13 | length 7.8
  Top Layer w0.254: R17.2@79.167,50.546 79.167,48.387 79.167,46.228 79.167,44.912 79.502,44.577 U4.13@79.502,42.926
NetR25_1: R25.1 U8.5 | length 3.8
  Top Layer w0.254: U8.5 96.107,74.041 R25.1
NetR25_2: R25.2 U6.1 U6.8 | length 10.8
  Top Layer w0.254: R25.2@99.473,74.295 100.323,74.295 101.84,75.812 U6.8 102.489,75.776 v1(102.489,74.803) ; U6.1 107.569,75.718 v1(107.569,74.803)
  Bottom Layer w0.254: v1(102.489,74.803) v1(107.569,74.803)
NetR26_1: R26.1 U9.7 | length 4.7
  Top Layer w0.254: U9.7 93.98,24.13 94.996,25.146 R26.1
NetR26_2: R26.2 U7.4 U7.5 | length 10.6
  Top Layer w0.254: R26.2 100.203,25.146 101.3,24.049 102,24.049 U7.5 102.189,23.876 102.362,24.049 v1(102.362,24.892) ; U7.4 107.188,23.941 v1(107.188,24.892)
  Bottom Layer w0.254: v1(102.362,24.892) v1(107.188,24.892)
NetR27_1: R27.1 U9.5 | length 4.9
  Top Layer w0.254: U9.5 93.98,21.59 95.504,23.114 R27.1
NetR27_2: R27.2 U7.1 U7.8 | length 11
  Top Layer w0.254: R27.2 99.441,22.765 99.441,21.844 101.06,20.225 102.014,20.225 U7.8 ; v1(102.489,19.05) 102.489,20.059 U7.8@102.525,20.095 ; v1(105.41,20.066) U7.1
  Bottom Layer w0.254: v1(102.489,19.05) 104.394,19.05 v1(105.41,20.066)
NetR28_1: R28.1 U8.7 | length 3.6
  Top Layer w0.254: U8.7 96.615,76.581 R28.1
NetR28_2: R28.2 U6.4 U6.5 | length 12.4
  Top Layer w0.254: R28.2 99.359,76.975 99.359,78.404 100.546,79.591 102.494,79.591 U6.5 102.489,79.658 v1(102.489,80.645) ; U6.4 107.569,79.716 v1(107.569,80.518)
  Bottom Layer w0.254: v1(102.489,80.645) 107.348,80.645 107.475,80.518 v1(107.569,80.518)
NetR29_1: R29.1 R30.2 U12.5 | length 4.3
  Top Layer w0.254: U12.5 108.712,45.625 R29.1 R30.2
NetR39_2: R39.2 R41.2 U13.6 | length 5.1
  Top Layer w0.254: R39.2 R41.2 64.135,67.737 U13.6
PROX_ALARM_OUT: J6.1 U15.8 | length 151.1
  Top Layer w0.254: v1(28.702,56.388) 27.305,57.785 27.305,74.676 v1(30.48,77.851) ; v1(40.513,51.308) U15.8
  Bottom Layer w0.254: v1(28.702,56.388) 33.782,51.308 v1(40.513,51.308) ; v1(30.48,77.851) 37.592,84.963 40.05,84.963 48.432,93.345 61.468,93.345 62.611,92.202 62.611,85.581 64.389,83.803 105.647,83.803 107.696,85.852 107.696,88.9 110.236,91.44 113.538,91.44 115.951,89.027 115.951,84.601 116.713,83.839 J6.1
PWM_L: R5.2 U2.14 U9.2 | length 51.1
  Top Layer w0.254: U9.2 v1(88.773,24.13) ; U2.14 101.219,57.704 101.397,57.526 101.732,57.526 102.154,57.104 R5.2 103.378,55.753 104.648,54.483 104.648,52.578 103.759,51.689 103.759,40.877 104.14,40.496 v1(104.14,29.591)
  Bottom Layer w0.254: v1(88.773,24.13) 98.933,24.13 104.074,29.271 104.074,29.525 v1(104.14,29.591)
PWM_R: R6.2 U2.8 U8.2 | length 27.6
  Top Layer w0.254: v1(87.376,72.009) 86.233,73.152 86.233,75.946 86.868,76.581 U8.2@87.763,76.581 ; v1(91.186,57.277) 91.223,57.277 R6.2@92.537,55.963 ; R6.2 R6.2@92.537,55.963 ; U2.8 93.599,57.704 93.421,57.526 93.219,57.526 92.537,56.844 R6.2@92.537,55.963
  Bottom Layer w0.254: v1(87.376,72.009) 91.186,68.199 v1(91.186,57.277)
PWM_U1O1: R1.1 R2.1 U1.1 | length 5.1
  Top Layer w0.254: R2.1 92.502,32.985 R1.1 ; R1.1@92.791,33.274 92.91,33.393 92.91,33.982 93.58,34.652 93.58,35.85 U1.1
PWM_U1O2: C5.1 R3.1 U1.7 U1.10 U1.12 | length 17.9
  Top Layer w0.254: U1.12 96.139,41.275 96.647,40.767 98.171,40.767 ; U1.10 98.679,41.275 98.171,40.767 ; C5.1@102.488,33.401 102.09,33.799 102.09,34.181 101.397,34.874 101.397,35.691 U1.7 101.041,36.047 101.041,39.04 99.949,40.132 98.806,40.132 98.171,40.767 ; R3.1@102.535,31.242 C5.1@102.535,33.332
PWM_U1O3: R7.1 U1.8 | length 9.5
  Top Layer w0.254: U1.8 101.981,42.799 102.535,43.353 R7.1@102.535,51.308
PWM_U1O4: R10.1 U1.14 | length 9
  Top Layer w0.254: R10.1@92.41,50.927 92.41,43.353 92.964,42.799 U1.14
PWM_U2O1: R8.1 R9.1 U2.1 | length 29
  Top Layer w0.254: v1(91.206,53.593) R9.1 R9.1 ; U2.1@101.219,65.994 U2.1 101.255,65.278 v1(102.362,65.278) ; R8.1 v1(103.505,53.594)
  Bottom Layer w0.254: v1(91.206,53.593) v1(103.505,53.594) 103.505,61.595 102.362,62.738 v1(102.362,65.278)
RL_bal_vol: RL_Bal.2 U13.3 | length 30.4
  Top Layer w0.254: RL_Bal.2 52.07,76.835 53.213,75.692 53.213,66.167 v1(55.245,64.135) ; v1(67.945,63.5) U13.3
  Bottom Layer w0.254: v1(55.245,64.135) 55.88,63.5 v1(67.945,63.5)
RL_out: R49.1 U13.1 U13.2 | length 13.3
  Top Layer w0.254: U13.2 U13.1 70.485,68.326 74.041,71.882 75.773,71.882 76.714,70.941 76.924,70.941 77.297,70.568 R49.1
SENS_AVG_INV: R50.2 R51.2 R52.1 U15.6 | length 33
  Top Layer w0.254: R50.2@31.369,43.647 31.369,47.498 32.639,48.768 ; R51.2 31.45,49.957 32.639,48.768 ; R51.2@31.623,56.434 R51.2@31.831,56.642 ; U15.6@39.243,46.954 39.243,47.634 v1(38.109,48.768) 32.639,48.768 ; R52.1 42.291,56.688 v1(42.291,54.229)
  Bottom Layer w0.254: v1(38.109,48.768) 39.751,48.768 42.291,51.308 v1@42.291,54.173
SENS_AVG_OUT: R52.2 U15.7 U15.9 | length 10.9
  Top Layer w0.254: R52.2@40.213,56.94 40.213,56.686 39.243,55.716 U15.9 39.243,50.546 40.513,49.276 U15.7@40.513,46.954
SENS_FL1_BUF: R50.1 U15.1 U15.2 | length 4.4
  Top Layer w0.254: U15.1@32.893,46.954 34.163,46.954 U15.2 34.06,46.815 34.06,45.744 33.454,45.138 33.454,44.457 R50.1@33.193,44.196
SENS_FL1_OUT: CONF1.3 U15.3 | length 61.8
  Top Layer w0.254: U15.3 35.433,46.238 35.255,46.06 35.238,46.06 34.417,45.239 34.417,41.003 32.004,38.59 32.004,20.447 44.045,8.406 CONF1.3 ; U15.3@35.433,46.954 U15.3@35.433,47.634
SENS_FL2_BUF: R51.1 U15.13 U15.14 | length 4.4
  Top Layer w0.254: U15.14@32.893,53.884 34.163,53.884 34.163,55.118 33.528,55.753 R51.1@33.528,56.286 ; R51.1@33.401,56.342 R51.1@33.701,56.642
SENS_FL2_OUT: CONF2.3 U15.12 | length 59.4
  Top Layer w0.254: U15.12 35.303,53.978 35.303,54.994 34.544,55.753 34.544,59.055 32.131,61.468 32.131,78.311 45.236,91.416 CONF2.3 ; CONF2.3@59.045,91.578 59.32,91.578 59.436,91.694 59.552,91.578 CONF2.3@59.827,91.578
SENS_SL_BUFF: R22.1 U5.13 U5.14 | length 4.7
  Top Layer w0.254: R22.1@46.655,56.305 46.655,56.515 46.609,56.469 U5.14 U5.13 U5.13@47.879,54.655
SENS_SL_OUT: CON_R.3 U5.12 | length 14.3
  Top Layer w0.254: CON_R.3 48.006,59.158 48.006,56.261 48.971,55.296 48.971,54.153 U5.12
SENS_SR_BUFF: R20.1 U5.1 U5.2 | length 4.6
  Top Layer w0.254: R20.1 46.609,44.531 U5.1 U5.2 U5.2@47.879,46.365
SENS_SR_OUT: CON_L.3 U5.3 | length 17.3
  Top Layer w0.254: CON_L.3 38.862,37.211 41.021,39.37 44.577,39.37 48.006,42.799 48.006,44.704 48.971,45.669 48.971,46.867 U5.3
U1O1: C50.1 R36.2 R44.2 U13.8 | length 32.4
  Top Layer w0.254: R44.2 57.531,29.637 v1(57.531,32.258) ; v1(60.325,40.513) 60.325,46.148 60.198,46.275 60.198,52.832 60.833,53.467 61.457,53.467 C50.1 61.768,53.537 R36.2 ; R36.2@61.457,55.175 61.457,55.742 61.722,56.007 61.722,56.671 62.577,57.526 62.687,57.526 62.865,57.704 U13.8
  Bottom Layer w0.254: v1(57.531,32.258) 60.325,35.052 v1(60.325,40.513)
U1O2: R40.1 R43.2 U13.14 | length 41.9
  Top Layer w0.254: R43.2 62.057,29.464 v1(62.865,29.464) ; U13.14 70.663,58.206 70.663,57.526 71.501,56.688 71.501,56.261 71.928,55.834 R40.1@71.928,55.626 ; R40.1 R40.1@71.928,55.626 ; v1(73.533,30.607) 73.533,54.61 72.517,55.626 R40.1@71.928,55.626
  Bottom Layer w0.254: v1(62.865,29.464) 64.008,30.607 v1(73.533,30.607)
U1O3: R41.1 R42.2 U13.7 | length 44
  Top Layer w0.254: R42.2 51.481,32.05 59.055,39.624 59.055,53.467 60.452,54.864 60.452,56.813 61.468,57.829 61.468,64.262 62.692,65.486 U13.7 62.865,65.994 62.687,66.172 62.606,66.172 61.93,66.848 R41.1
U2N1: KI.3 R44.1 U14.2 | length 18.5
  Top Layer w0.254: KI.3 55.499,29.545 R44.1 55.797,29.843 55.797,32.302 61.214,37.719 63.373,37.719 64.023,37.069 64.023,36.017 U14.2@64.135,35.905
U2N2: KD.3 R43.1 U14.6 | length 19.2
  Top Layer w0.254: R43.1@59.944,29.591 59.944,30.607 v1(60.452,31.115) ; R43.1 60.242,29.339 60.242,28.404 61.468,27.178 KD.3 ; U14.6@69.215,35.905 v1(69.215,37.592)
  Bottom Layer w0.254: v1(60.452,31.115) 64.77,35.433 67.056,35.433 v1(69.215,37.592)
U2N3: KP.3 R42.1 U14.9 | length 30.7
  Top Layer w0.254: KP.3 v1(49.53,31.115) ; v1(69.215,41.148) U14.9@69.215,42.835
  Bottom Layer w0.254: v1(49.53,31.115) 58.42,31.115 68.453,41.148 v1(69.215,41.148)
U2N4: R45.1 R46.2 R47.2 R48.2 U14.13 | length 39.4
  Top Layer w0.254: R46.2 R46.2@63.919,32.901 ; v1(63.754,31.623) 63.754,32.564 63.919,32.564 R46.2@63.919,32.901 ; v1(63.881,46.99) 63.881,45.547 R45.1 64.135,45.131 U14.13@64.135,42.835 ; R46.2@63.919,32.931 R46.2@63.919,32.901 ; R46.2@64.046,32.564 64.046,32.774 R46.2@63.919,32.901 ; R47.2@71.047,33.409 71.42,33.782 71.42,33.274 71.563,33.417 72.152,33.417 72.436,33.701 72.436,44.658 72.152,44.942 71.793,44.942 71.42,45.315 R48.2 71.501,45.501 v1(71.501,46.944) ; v1(71.374,31.623) 71.374,32.931 R47.2@71.501,33.058
  Bottom Layer w0.254: v1(63.754,31.623) v1(71.374,31.623) ; v1@63.881,46.944 v1(71.501,46.944)
U2O1: KI.2 R46.1 U14.1 | length 17.3
  Top Layer w0.254: KI.2 57.137,23.228 58.674,24.765 58.674,30.3 61.521,33.147 R46.1@61.676,33.147 ; R46.1 62.129,33.473 62.129,34.062 62.635,34.568 62.635,34.944 U14.1@62.738,35.047 ; U14.1@62.687,35.047 62.865,35.225 62.865,35.742 U14.1@62.865,35.905 ; U14.1@62.738,35.225 U14.1
U2O2: KD.2 R47.1 U14.7 | length 18.3
  Top Layer w0.254: KD.2 65.659,23.241 69.596,27.178 R47.1@69.596,32.923 ; R47.1@69.55,33.274 69.876,33.6 69.876,34.189 70.255,34.568 70.255,35.639 U14.7
U2O3: KP.2 R48.1 U14.8 | length 39.7
  Top Layer w0.254: KP.2 52.451,23.241 53.721,24.511 53.721,32.385 61.341,40.005 v1(61.341,41.656) ; R48.1 69.85,45.12 69.85,44.45 70.337,43.963 70.337,42.983 70.521,42.799 v1(71.501,42.799)
  Bottom Layer w0.254: v1(61.341,41.656) 62.484,42.799 v1(71.501,42.799)
V_IN_NEG: R22.2 R23.1 U5.9 | length 16.1
  Top Layer w0.254: R22.2@44.785,56.515 44.831,56.469 v1(44.831,54.737) ; v1(52.959,52.197) U5.9 53.108,54.124 53.108,55.103 54.61,56.605 R23.1@54.61,56.642
  Bottom Layer w0.254: v1(44.831,54.737) 47.371,52.197 v1(52.959,52.197)
V_IN_POS: R20.2 R21.1 U5.10 | length 20.7
  Top Layer w0.254: R20.2 44.704,44.496 v1(44.704,46.228) ; v1(51.689,51.181) U5.10 51.867,54.153 51.867,54.915 52.705,55.753 52.705,58.293 53.324,58.912 R21.1@54.802,58.912
  Bottom Layer w0.254: v1(44.704,46.228) 49.657,51.181 v1(51.689,51.181)
VBAT: J5.2 Q1.1 Q1.2 Q1.3 R31.1 | length 2.8
  Top Layer w0.254: R31.1@114.3,23.957 114.3,26.797
VIN: C30.2 C37.1 Q1.5 Q1.6 Q1.7 Q1.8 Q2.1 Q2.2 Q2.3 R32.2 R34.2 U10.2 U12.6 | length 35.8
  Top Layer w0.254: U12.6 109.991,47.613 109.991,46.6 110.519,46.072 R34.2@110.519,45.786 ; C30.2 C30.2@111.136,38.354 ; Q2.3 Q2.3@117.981,72.707 ; C37.1 C37.1@119.556,37.465 ; v4@120.587,72.707 v4(120.65,72.771) ; v4(120.65,69.723) R32.2
  Top Layer w0.6: U10.2@106.807,36.83 108.331,36.83 109.844,38.343 C30.2 ; R34.2 110.966,44.101 111.506,43.561 113.919,43.561 118.406,39.074 118.406,37.755 C37.1 ; C30.2@111.136,38.354 v5(113.411,38.354) ; Q2.1 120.067,70.104 120.448,69.723 v4(120.65,69.723) ; Q2.2 v4(120.65,71.374) ; Q2.3@117.981,72.707 v4@120.587,72.707
  Top Layer w0.8: C37.1@119.556,37.465 119.631,37.465 121.501,39.335 121.501,39.459 v5(121.539,39.497)
  other v5: 123.952,26.416 123.952,28.067 123.952,29.718 124.206,31.242
VIN_Motor: C22.1 C23.2 C24.1 C25.2 C26.2 C27.P C28.2 C29.P Q2.5 Q2.6 Q2.7 Q2.8 U6.7 U7.7 U8.6 U9.6 | length 67.9
  Top Layer w0.254: 92.456,75.311 U8.6 U8.6@93.838,75.311 ; C27.P@108.103,13.377 108.78,12.7 C27.P@109.399,12.7 ; C29.P C29.P@109.576,86.487 ; C27.P@109.194,13.413 C27.P C27.P@110.084,13.208 ; v3@111.481,88.392 v3(111.506,88.392)
  Top Layer w0.6: C22.1@91.304,81.915 91.304,80.03 91.324,80.01 91.324,76.316 92.326,75.314 93.345,75.314 U8.6 ; C22.1 91.431,81.915 v3(95.123,81.915) ; U9.6 91.567,22.86 90.796,22.089 C24.1 90.816,19.538 C25.2 94.361,17.399 v4(94.869,17.907) ; v3@112.116,11.176 v3(112.141,11.176) ; Q2.8 114.3,70.104 v3(115.062,70.866) 114.842,70.866 114.334,71.374 Q2.7 ; Q2.6 114.356,72.644 114.736,73.024 114.934,73.024 v3(115.062,73.152) ; Q2.5 114.376,73.914 115.068,73.222 v3@115.068,73.158
  Top Layer w0.8: U7.7 103.378,21.336 104.379,20.335 104.379,19.13 105.373,18.136 106.567,18.136 C28.2 106.669,16.775 109.194,14.25 C27.P@109.194,13.413 ; U6.7 103.498,77.082 104.267,77.851 104.267,79.375 106.355,81.463 107.129,81.463 107.304,81.638 C26.2@107.304,81.788 ; C26.2@107.315,81.799 107.315,83.312 109.004,85.001 109.004,86.374 C29.P ; C29.P@109.576,86.487 v3@111.481,88.392 ; C27.P@110.084,13.208 v3@112.116,11.176
VIN_NEG: C32.2 C34.2 C36.2 D1.A R29.2 U11.1 U12.4 | length 43
  Top Layer w0.254: R29.2 106.648,50.408 108.712,52.472 U12.4 108.712,53.452 107.578,54.586 C34.2 107.774,56.203 107.774,56.974 108.458,57.658 112.649,57.658 113.247,57.06 113.247,56.297 D1.A
  Top Layer w0.6: U11.1 110.222,65.786 110.573,65.435 110.573,65.31 110.848,65.035 112.638,65.035 114.808,62.865 C36.2 118.442,59.641 114.935,56.134 D1.A
pads on no net: KD.1 KI.1 KP.1 PostMul.3 PreMul.1 S1.2 U2.5 U2.6 U2.7 U4.1 U4.2 U4.3 U4.5 U4.6 U4.7 U8.1 U8.8 U9.1 U9.8

## Polygon pours and split planes (outlines as drawn)
+5V on Bottom Layer "+5V_L02_P002" (solid, pour order 2): 47.868,93.006 63.006,93.006 62.914,82.852 92.837,82.852 92.837,78.994 110.109,78.994 112.066,76.961 112.066,73.107 109.051,69.327 100.542,69.327 94.605,69.327 92.912,67.539 92.837,63.001 87.184,58.665 59.423,58.665 51.58,67.183 46.031,67.183 44.383,64.777 39.003,64.533 32.553,58.658 32.553,47.509 37.39,42.672 92.329,42.672 107.696,42.672 107.696,35.172 113.919,30.07 114.046,22.606 111.697,20.256 92.946,20.256 93.008,16.566 63.165,16.446 63.165,7.547 47.868,7.547 14.097,29.537 14.097,69.702